# Altium PCB sdc-le-a3.PcbDoc
Units mm, origin at the board's own origin, x right, y up, seen from the top; angles counter-clockwise.
Board outline 27.6 x 32.83 mm, 2 copper layers (Top Layer, Bottom Layer), stack 1.58 mm thick; 1 components, 0 nets, 21 pads, 0 vias.
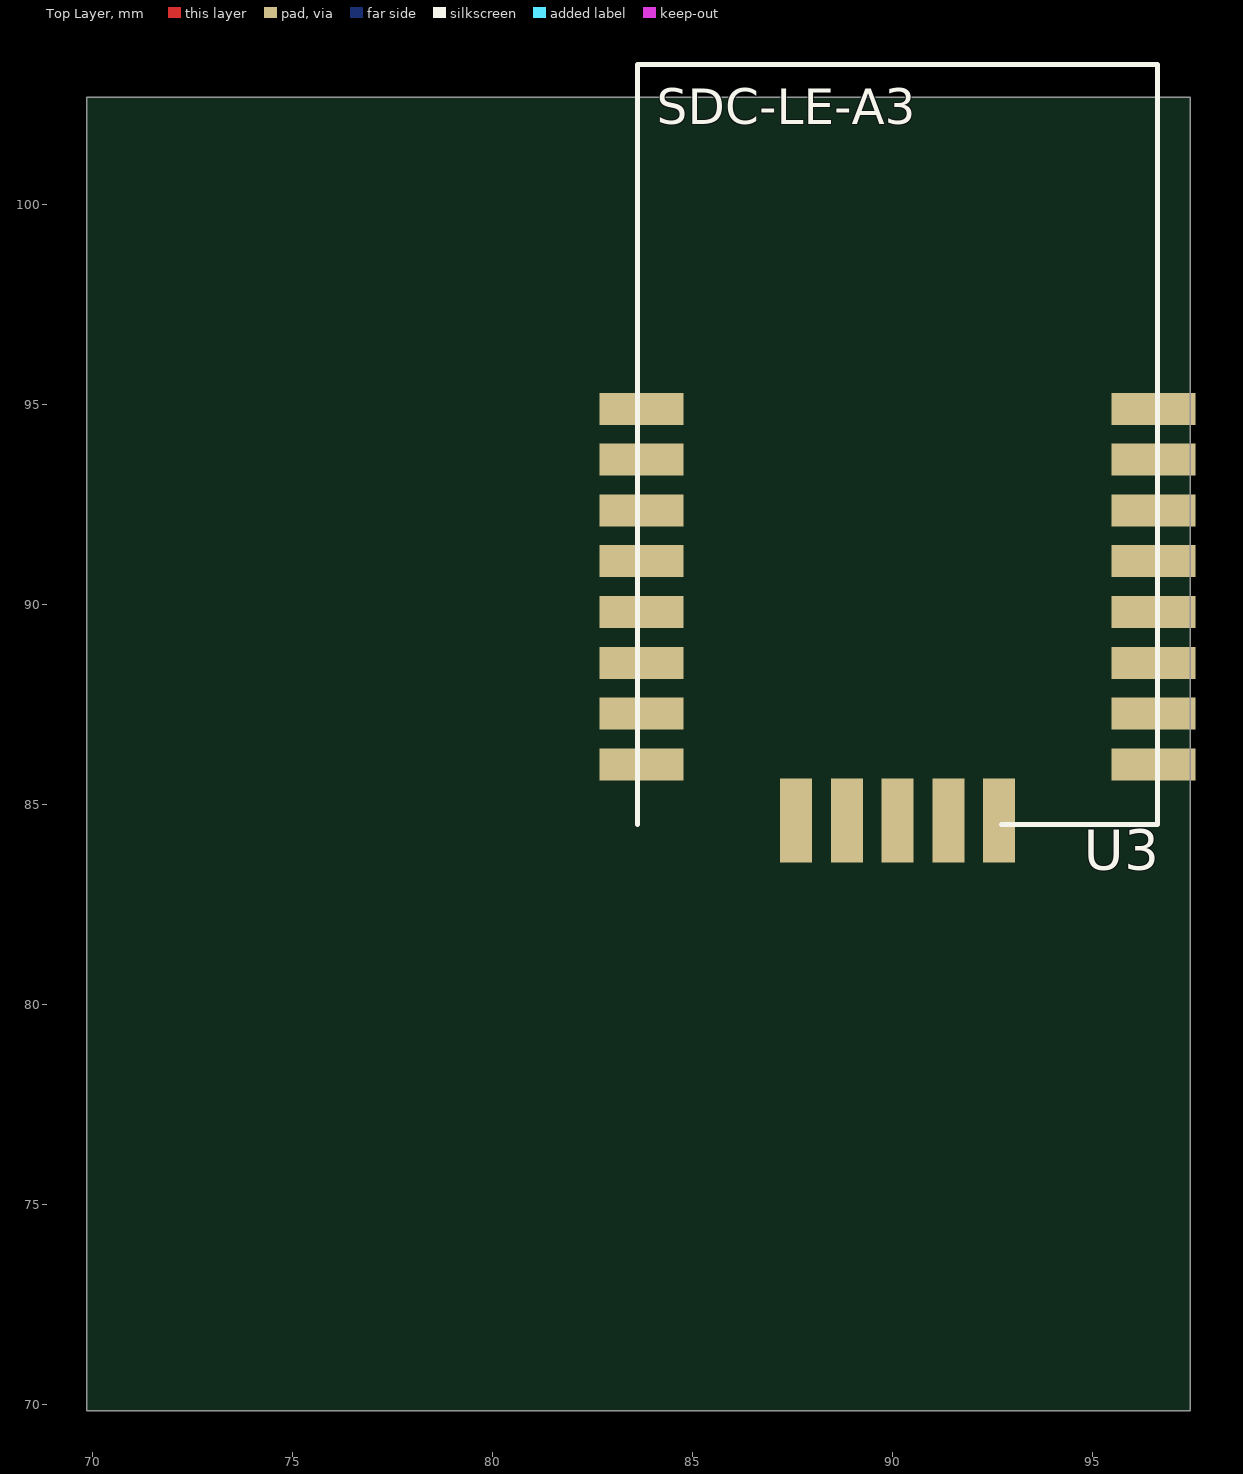
[diagram p0: Top Layer view]
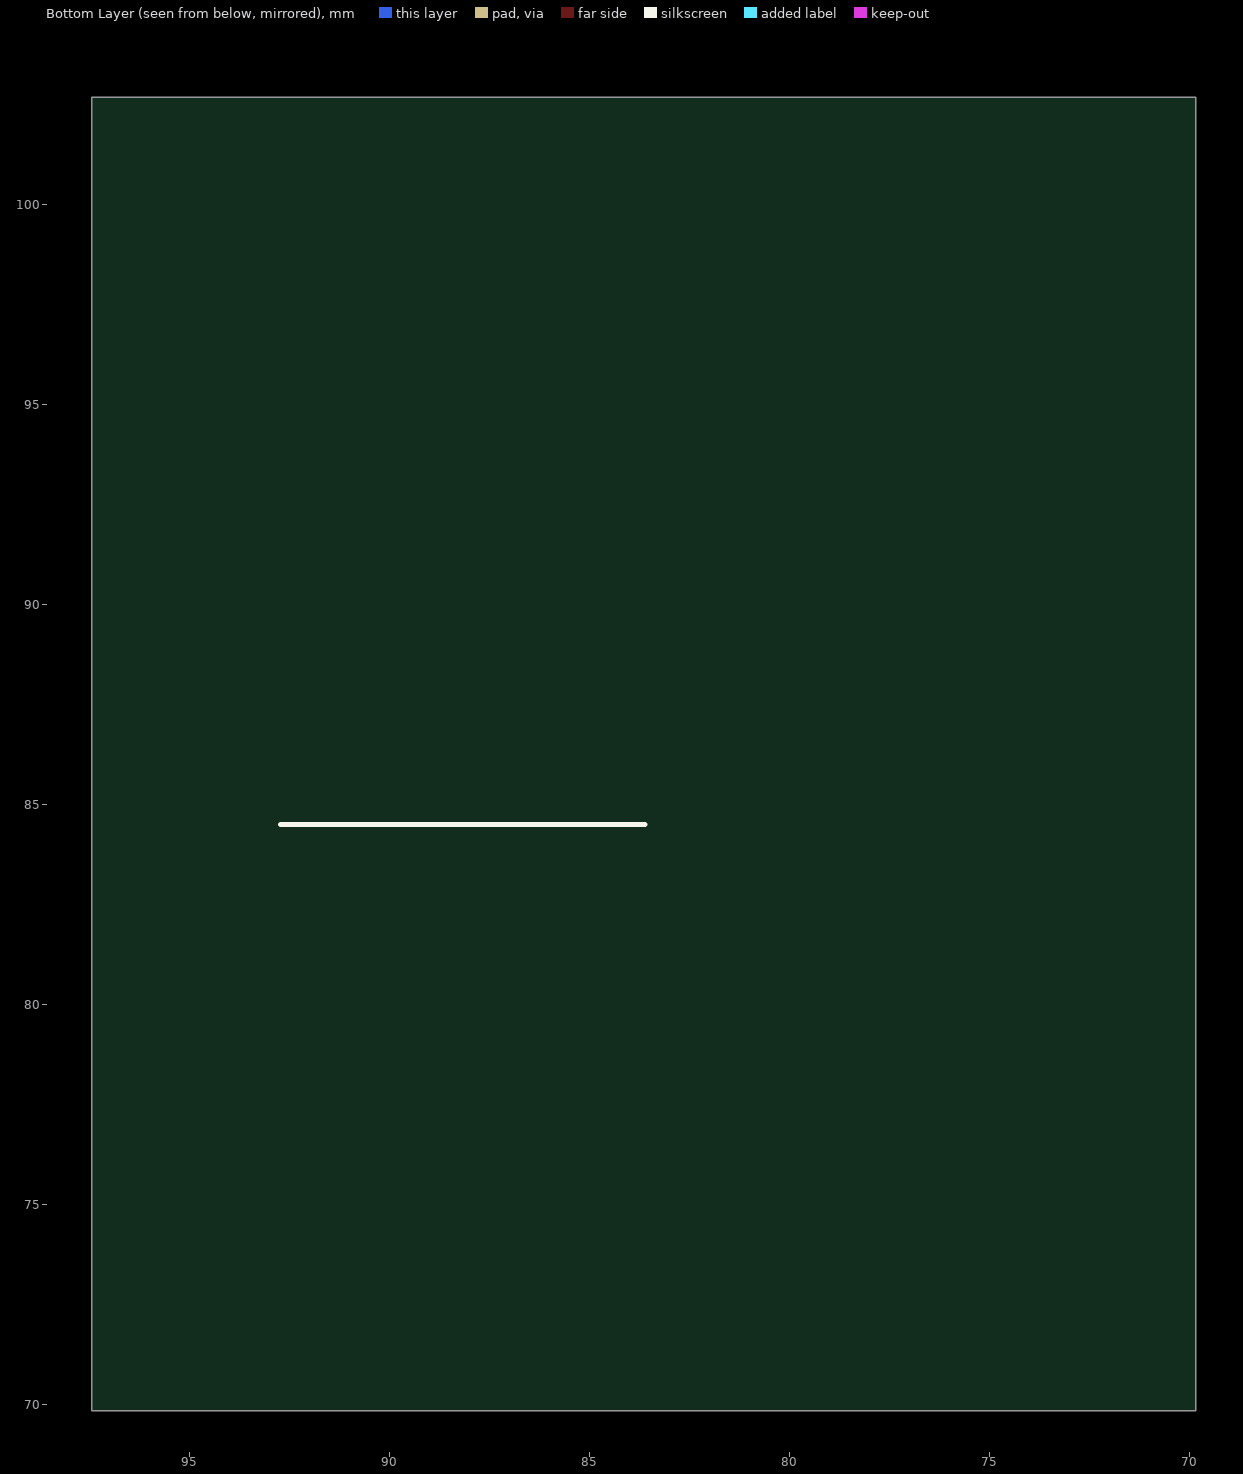
[diagram p1: Bottom Layer view, seen from below]

## Layer stack, top to bottom
Top Solder Mask Layer: solder mask 0.0102, Dk 3.3
Top Layer: signal copper 0.0356
Dielectric1: surface 1.5088, FR4, Dk 4.5
Bottom Layer: signal copper 0.0356
Bottom Solder Mask Layer: solder mask 0.0102, Dk 3.3

## Board outline
97.45,69.85 69.85,69.85 69.85,102.685 97.45,102.685

## Components (designator, comment, footprint, x,y, rotation, side; value= is the part's Value field where it differs from the comment)
? "" "SDC-LE-A3(AB2021A3 模组)" 83.726,86.007 r0 top

## Footprints (in the part's own frame and the unit in brackets; to place one, negate y for a bottom-side part, rotate by r counter-clockwise, add the part's x,y. Pads: shape width x height; smd on the part's side, far side on the other; paste and mask are expansions set on the pad)
"SDC-LE-A3(AB2021A3 模组)" [mil]
  rect 82.7x31.5 smd paste+0 mask+2: 1(0,350) 2(0,300) 3(0,250) 4(0,200) 5(0,150) 6(0,100) 7(0,50) 8(0,0) 14(504,350) 15(504,300) 16(504,250) 17(504,200) 18(504,150) 19(504,100) 20(504,50) 21(504,0)
  rect 31.5x82.7 smd paste+0 mask+2: 9(152,-55.2) 10(202,-55.2) 11(252,-55.2) 12(302,-55.2) 13(352,-55.2)
  silkscreen extent -4,-59 508,689

## Nets (pads, with @x,y where several pads share a name; then routed paths per layer and width w, separated by ;. In a path a pad name is that pad's centre, name@x,y a point inside that pad or via, vN(x,y) a via of type N, cw(c..) or ccw(c..) an arc to the next point about the centre after c; other vN are vias at no path point)
pads on no net: ?.1 ?.2 ?.3 ?.4 ?.5 ?.6 ?.7 ?.8 ?.9 ?.10 ?.11 ?.12 ?.13 ?.14 ?.15 ?.16 ?.17 ?.18 ?.19 ?.20 ?.21

## Text inside footprints (layer, text, board x,y; h text height)
?: Top Silkscreen Layer "SDC-LE-A3" at 84.107,102.009 h0.89; Top Silkscreen Layer "U3" at 94.785,83.37 h1